# EAGLE board 2026-10-24_14-11-39 (EAGLE 6.4)
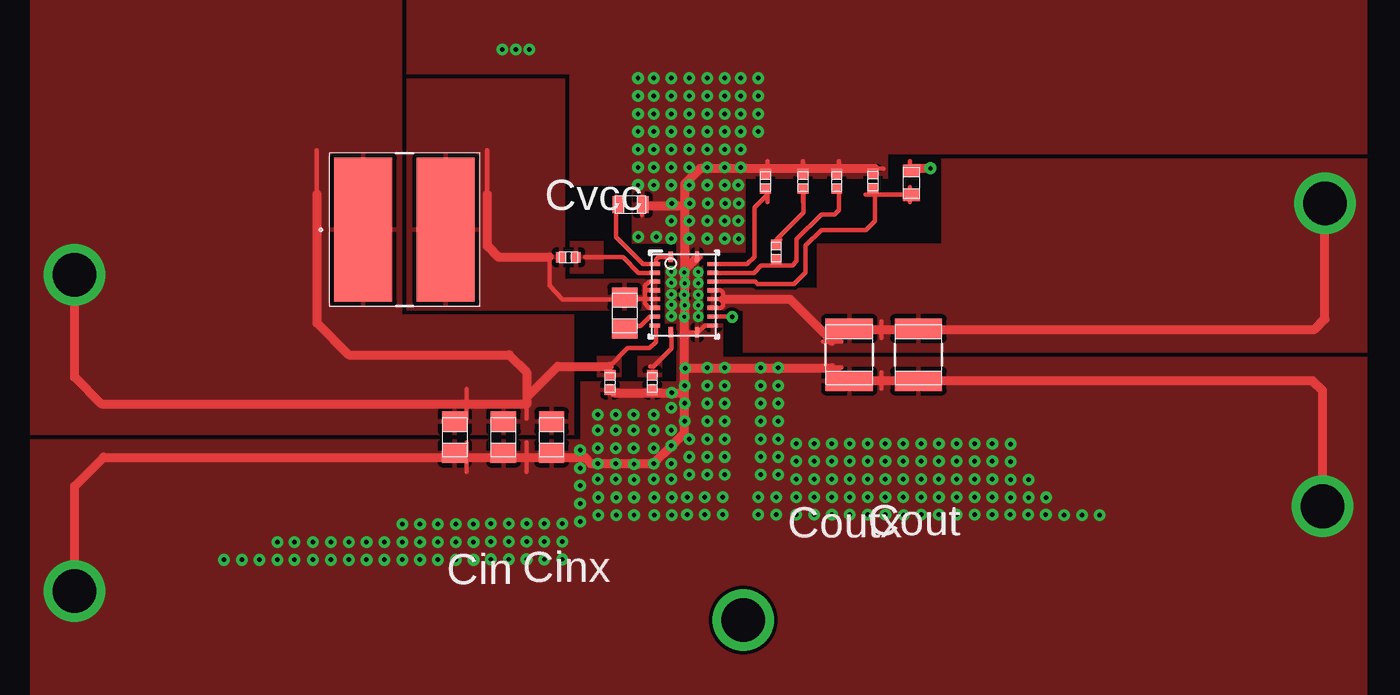
[diagram p0: board, top side]
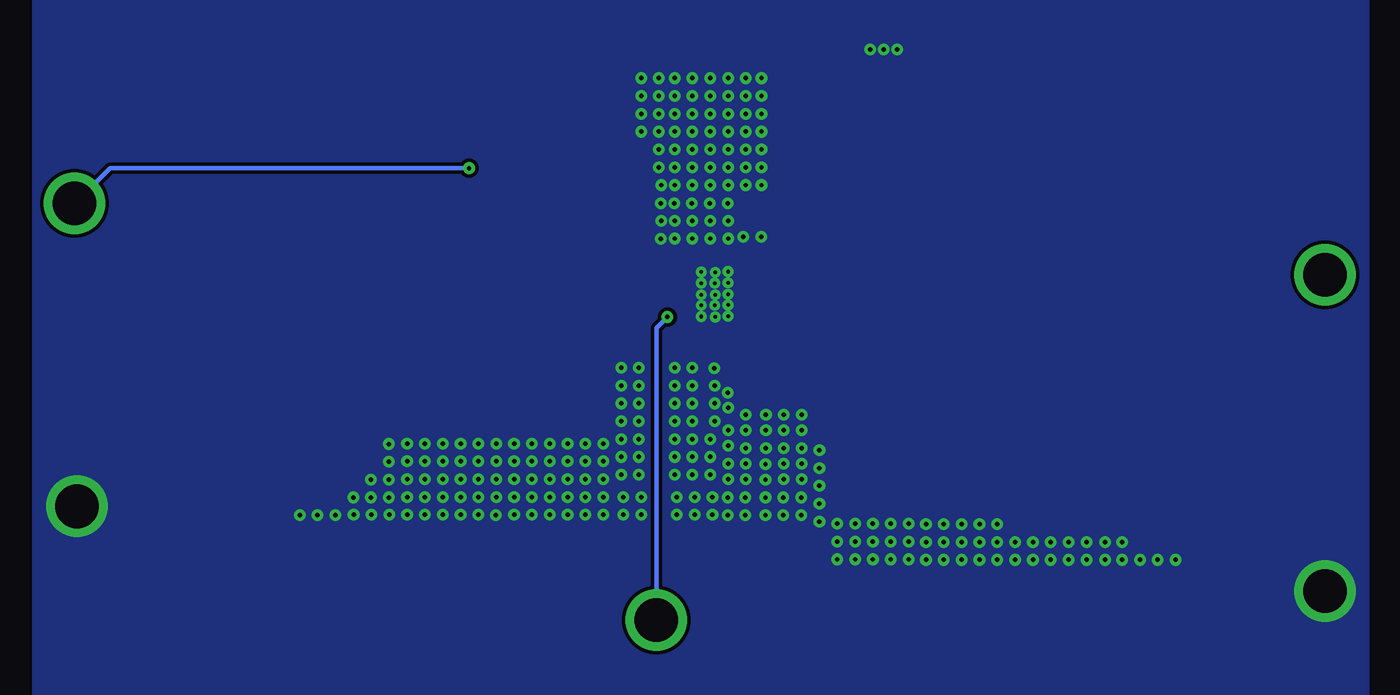
[diagram p1: board, bottom side, seen from below]

No outline drawn. Coordinates in mm, seen from the top.
Copper layers ((1*2)+(15*16)): TOP / INTERNAL1 / layer 15 / BOTTOM

## Footprints (pad centres in the part's own frame; a part is rotated, then mirrored left to right if it is on the bottom)
0805 = smd 1.118 x 1.448: 1 -0.902,0; 2 0.902,0
0402 = smd 0.559 x 0.61: 1 -0.419,0; 2 0.419,0
1210_280 = smd 1.118 x 2.692: 1 -1.499,0; 2 1.499,0
0603 = smd 0.66 x 0.965: 1 -0.699,0; 2 0.699,0
TP-1502 = drill 0.813 pad 1.651 round: 1 0,0
VLP8040 = smd 3.302 x 8.204: 1 -2.349,0; 2 2.349,0
RHL0020A = smd 0.24 x 0.6: 1 -0.75,2.15; 10 -0.75,-2.15; 11 0.75,-2.15; 20 0.75,2.15 | smd 0.6 x 0.24: 2 -1.65,1.75; 3 -1.65,1.25; 4 -1.65,0.75; 5 -1.65,0.25; 6 -1.65,-0.25; 7 -1.65,-0.75; 8 -1.65,-1.25; 9 -1.65,-1.75; 12 1.65,-1.75; 13 1.65,-1.25; 14 1.65,-0.75; 15 1.65,-0.25; 16 1.65,0.25; 17 1.65,0.75; 18 1.65,1.25; 19 1.65,1.75 | smd 0.3 x 0.3: 21 0,0

## Placement (x,y rotation side)
Cbst  [0805]  60.55,53.7 270 top
Ccomp  [0402]  70.71,61.19 90 top
Ccomp2  [0402]  72.64,61.19 90 top
Cin2  [0402]  59.72,49.73 270 top
Cin_1  [0805]  56.39,46.61 270 top
Cin_2  [0805]  53.64,46.61 270 top
Cin_3  [0805]  50.88,46.61 270 top
Cout_1  [1210_280]  73.36,51.31 270 top
Cout_2  [1210_280]  77.29,51.31 270 top
Css  [0402]  62.13,49.73 270 top
Cvcc_1  [0603]  60.88,59.87 0 top
Cvcc_2  [0603]  60.88,59.87 0 top
GND  [TP-1502]  29.18,37.85 270 top
GND1  [TP-1502]  100.28,42.65 270 top
L1  [VLP8040]  48.01,58.45 0 top
MODE  [TP-1502]  67.28,36.2 270 top
Rcomp  [0402]  69.19,57.18 90 top
Rfbb  [0402]  74.7,61.21 90 top
Rfbt  [0603]  76.89,61.11 270 top
Rlim  [0402]  68.58,61.19 90 top
Rt  [0402]  57.35,56.87 0 top
U1  [RHL0020A]  63.93,54.74 0 top
VIN  [TP-1502]  29.18,55.83 270 top
VOUT  [TP-1502]  100.38,59.89 270 top

## Library data of the parts
Cbst = ultra-librarian; RefDes: Cbst; Type: 08053C104KAT2A
Ccomp = ultra-librarian; RefDes: Ccomp; Type: GRM1555C1E751JA01D
Ccomp2 = ultra-librarian; RefDes: Ccomp2; Type: GRM1555C1E390JA01D
Cin2 = ultra-librarian; RefDes: Cin2; Type: GRM155R71A104KA01D
Cin_1-Cin_3 Cout_1 Cout_2 Cvcc_1 Cvcc_2 = ultra-librarian
Css = ultra-librarian; RefDes: Css; Type: GRM155R71C822KA01D
GND = ultra-librarian; RefDes: GND; Type: TP-1502
GND1 = ultra-librarian; RefDes: GND1; Type: TP-1502
L1 = ultra-librarian; RefDes: L1; Type: VLP8040T-1R0N
MODE = ultra-librarian; RefDes: MODE; Type: TP-1502
Rcomp = ultra-librarian; RefDes: Rcomp; Type: CRCW040226K7FKED
Rfbb = ultra-librarian; RefDes: Rfbb; Type: CRCW040269K8FKED
Rfbt = ultra-librarian; RefDes: Rfbt; Type: RC0603FR-07220KL
Rlim = ultra-librarian; RefDes: Rlim; Type: CRCW0402154KFKED
Rt = ultra-librarian; RefDes: Rt; Type: CRCW0402267KFKED
U1 = ultra-librarian; RefDes: U1; Type: TPS61088RHLR
VIN = ultra-librarian; RefDes: VIN; Type: TP-1502
VOUT = ultra-librarian; RefDes: VOUT; Type: TP-1502

## Nets
0: Ccomp2.2 Ccomp.2 Cin2.2 Cin_1.2 Cin_2.2 Cin_3.2 Cout_1.2 Cout_2.2 Css.2 Cvcc_1.2 Cvcc_2.2 GND1.1 GND.1 Rfbb.2 Rlim.2 U1.11 U1.12 U1.20 U1.21
2: Cin2.1 Cin_1.1 Cin_2.1 Cin_3.1 L1.1 U1.9 VIN.1
3: Ccomp.1 Rcomp.2
4: Cvcc_1.1 Cvcc_2.1 U1.1 U1.2
5: Ccomp2.1 Rcomp.1 U1.18
9: Cout_1.1 Cout_2.1 Rfbt.1 U1.14 U1.15 U1.16 VOUT.1
11: Rfbb.1 Rfbt.2 U1.17
12: Cbst.1 L1.2 Rt.1 U1.4 U1.5 U1.6 U1.7
14: Rlim.1 U1.19
17: Css.1 U1.10
18: Cbst.2 U1.8
19: Rt.2 U1.3
25: MODE.1 U1.13

## Tracks (layer width: path | path; a pad name or v marks a point on that pad's centre or on a via)
0  (via drill 0.2 pad 0.48, 0.25 pad 0.51, 2.49 pad 3.48)
  TOP 0.254: 65.61,52.98 65.13,52.98 64.72,52.58 63.98,52.58 63.96,52.58 | 74.27,61.94 75.31,61.94 | 72.76,61.52 72.76,62.36 | 70.73,61.52 70.73,62.36 | 68.69,61.52 68.69,62.36 | 71.86,50.58 72.9,50.58 | 61.56,59.28 61.56,60.33 | 54.97,44.63 54.97,46.3 | 75.18,49.38 75.18,50.32 | 51.54,44.63 51.54,46.3
  TOP 0.508: 63.98,59.82 63.98,60.98 63.98,61.06 64.87,61.95 68.71,61.95 70.74,61.95 | 63.98,59.82 63.98,58.95 63.98,56.16 | 63.98,56.16 v63.98,55.4 v63.98,54.13 63.98,53.49 v63.96,53.47 63.96,52.58 63.96,50.67 | 61.57,59.82 63.98,59.82 | 63.96,49.4 63.96,50.67 | 63.96,49.4 63.96,46.86 v63.22,46.13 v62.2,45.11 v60.05,45.11 v59.03,45.11 58.62,45.11 58.29,45.47 54.99,45.47 51.56,45.47 30.86,45.47 29.21,43.81 v29.21,37.85 | 59.69,49.4 59.94,49.15 62,49.15 63.73,49.15 63.96,49.4 | 63.96,50.67 64.03,50.57 v69.32,50.57 72.36,50.57 73.13,49.84 75.18,49.84 99.75,49.84 100.33,49.28 v100.33,42.67 | 63.98,56.16 64.72,56.9 | 59.69,49.4 | 63.96,49.4 | 70.74,61.95 72.77,61.95 74.8,61.95 | 70.74,61.95 | 74.8,61.95 | 61.57,59.82
  other vias: 63.22,54.76 63.96,56.01 64.74,54.74 63.22,53.52 63.22,54.15 63.22,56.06 37.72,39.62 39.75,39.62 41.73,39.62 67.06,59.94 87.63,42.16 86.61,42.16 85.6,42.16 84.58,43.18 83.57,43.18 82.55,45.21 82.55,44.2 82.55,43.18 82.55,46.23 40.77,39.62 40.77,40.64 41.73,40.64 42.8,39.62 42.8,40.64 43.81,39.62 43.81,40.64 44.83,39.62 44.83,40.64 45.85,39.62 45.85,40.64 55.12,68.71 76.45,42.16 64.01,50.55 69.19,43.21 58.01,44.86 63.22,48.29 73.38,46.25 63.96,54.74 48.9,40.64 48.9,39.62 48.9,41.66 60.07,42.16 60.07,43.18 47.88,41.66 47.88,39.62 47.88,40.64 46.86,40.64 46.86,39.62 61.09,43.18 61.09,42.16 49.91,41.66 49.91,39.62 49.91,40.64 50.93,40.64 50.93,39.62 50.93,41.66 62.23,42.16 62.23,43.18 64.74,54.13 64.74,53.49 64.74,55.4 63.22,55.42 64.74,56.03 68.3,50.57 66.27,50.57 65.25,50.57 68.3,49.56 65.25,49.56 66.27,49.56 66.27,47.52 63.22,47.02 63.98,47.52 65.25,47.52 60.05,47.9 59.03,47.9 68.17,43.21 66.14,43.21 58.01,45.87 64.11,43.21 63.25,43.18 65.13,43.21 69.32,49.56 64.11,42.19 63.25,42.16 69.19,42.19 65.13,42.19 66.14,42.19 68.17,42.19 61.06,47.02 59.03,47.02 60.05,47.02 62.2,47.02 79.48,45.24 74.4,45.24 72.36,45.24 73.38,45.24 78.46,45.24 75.41,45.24 76.43,45.24 77.44,45.24 70.33,45.24 69.32,47.52 68.3,47.52 71.35,45.24 71.35,44.22 68.3,46.51 69.32,46.51 70.33,44.22 77.44,44.22 76.43,44.22 75.41,44.22 78.46,44.22 73.38,44.22 72.36,44.22 74.4,44.22 79.48,44.22 60.05,46 59.03,46 58.01,43.84 61.06,46 55.98,41.68 54.97,41.68 53.95,41.68 57,41.68 51.94,41.66 52.93,41.68 65.25,46.51 64.24,46.51 66.27,46.51 66.27,44.48 63.22,44.22 64.24,44.48 65.25,44.48 52.93,39.65 51.94,39.62 57,39.65 53.95,39.65 54.97,39.65 55.98,39.65 61.09,44.2 58.01,41.81 59.03,44.22 60.05,44.22 62.2,44.22 79.48,42.19 74.4,42.19 72.36,42.19 73.38,42.19 78.46,42.19 75.41,42.19 77.44,42.19 70.33,42.19 69.32,44.48 68.3,44.48 71.35,42.19 71.35,43.21 68.3,45.49 69.32,45.49 70.33,43.21 77.44,43.21 76.43,43.21 75.41,43.21 78.46,43.21 73.38,43.21 72.36,43.21 74.4,43.21 79.48,43.21 58.01,42.82 55.98,40.67 54.97,40.67 53.95,40.67 57,40.67 51.94,40.64 52.93,40.67 65.25,45.49 64.24,45.49 63.22,45.11 66.27,45.49 83.54,42.19 80.49,42.19 81.51,42.19 82.52,42.19 84.56,42.19 65.25,57.94 63.22,57.94 64.24,57.94 66.27,57.94 65.25,58.95 63.22,58.95 64.24,58.95 66.27,58.95 66.29,59.94 63.25,59.94 64.26,59.94 65.28,59.94 66.27,60.99 63.22,60.99 64.24,60.99 65.25,60.99 67.03,60.99 61.32,62 67.16,62 65.25,62 64.24,62 63.22,62 66.27,62 62.2,63.02 66.27,63.02 63.22,63.02 64.24,63.02 65.25,63.02 67.16,63.02 68.17,64.03 67.16,64.03 65.25,64.03 64.24,64.03 63.22,64.03 66.27,64.03 62.2,64.03 62.2,65.05 66.27,65.05 63.22,65.05 64.24,65.05 65.25,65.05 67.16,65.05 68.17,65.05 68.17,66.07 67.16,66.07 65.25,66.07 64.24,66.07 63.22,66.07 66.27,66.07 62.2,66.07 68.17,67.08 67.16,67.08 65.25,67.08 64.24,67.08 63.22,67.08 66.27,67.08 62.2,67.08 61.32,60.99 62.2,62 62.2,60.99 71.35,46.25 68.3,48.54 69.32,48.54 70.33,46.25 77.44,46.25 76.43,46.25 75.41,46.25 78.46,46.25 72.36,46.25 74.4,46.25 79.48,46.25 62.2,47.9 61.06,47.9 65.25,48.54 66.27,48.54 81.51,46.25 80.49,46.25 81.51,43.21 80.49,43.21 81.51,44.22 80.49,44.22 80.49,45.24 81.51,45.24 61.32,67.08 61.32,66.07 61.32,65.05 61.32,64.03 61.32,63.02 63.25,49.15 59.05,42.16 59.05,43.18 53.59,68.71 38.73,39.62 54.36,68.71 63.98,49.56 63.98,48.54 62.2,46 61.09,45.09 83.57,44.2 62.36,58.04 61.34,58.04 67.06,57.91 67.03,58.95
  pour TOP: 58.04,49.78 63.5,49.78 63.5,53.09 62.87,53.09 62.87,56.39 63.5,56.39 63.5,57.66 60.96,57.66 60.96,60.96 57.4,60.96 57.4,67.31 48.13,67.31 48.13,82.55 102.87,82.55 102.87,62.74 75.56,62.74 75.56,61.34 67.44,61.34 67.44,57.15 65.02,57.15 65.02,53.09 66.17,53.09 66.17,51.18 102.87,51.18 102.87,26.67 26.67,26.67 26.67,46.48 58.04,46.48
  pour BOTTOM: 26.67,26.67 26.67,82.55 102.87,82.55 102.87,26.67
2  (via drill 2.49 pad 3.48)
  TOP 0.254: 59.69,50.65 60.71,51.69 61.98,51.69 62.33,52.05 62.33,52.98 | 54.97,47.68 54.97,49.35 | 43,57.94 43,62.97 | 51.54,47.68 51.54,49.35
  TOP 0.508: 54.99,48.9 54.99,50.29 53.98,51.31 44.83,51.31 43.03,53.11 43.03,60.45 | 54.99,48.9 54.99,48.51 51.56,48.51 30.73,48.51 29.21,50.04 v29.21,55.88 | 59.69,50.65 56.74,50.65 54.99,48.9
  pour TOP: 58.98,50.04 58.98,51.23 60.38,51.23 60.38,50.04
  pour TOP (rank 4): 47.88,82.55 47.88,53.59 57.66,53.59 57.66,46.74 26.67,46.74 26.67,82.55
3
  TOP 0.254: 69.44,57.89 69.22,57.89 70.74,59.41 70.74,60.45 | 70.73,60.02 70.73,60.86
4
  TOP 0.254: 63.22,56.9 62.48,56.9 62.33,56.74 62.33,56.49 61.59,56.49 60.07,58.01 60.07,59.82 | 60.06,59.28 60.06,60.33
5
  TOP 0.254: 65.61,55.98 67.92,55.98 68.33,56.39 69.22,56.39 70.1,56.39 70.36,56.64 70.36,57.91 71.75,59.31 72.52,59.31 72.77,59.56 72.77,60.45 | 72.76,60.02 72.76,60.86
9  (via drill 0.25 pad 0.51, 2.49 pad 3.48)
  TOP 0.254: 65.61,54.99 66.02,54.99 66.17,54.86 66.17,54.48 | 65.61,53.98 66.04,53.98 66.17,54.1 66.17,54.48 | 65.61,54.48 66.17,54.48 | 76.82,61.52 76.82,62.36 | 71.86,52.08 72.9,52.08 | 75.18,52.27 75.18,53.21
  TOP 0.508: v100.46,59.94 100.46,53.34 99.87,52.76 75.18,52.76 73.05,52.76 72.36,52.09 69.98,54.48 66.17,54.48 | 76.83,61.95 v77.98,61.95
  BOTTOM 0.254: v100.46,59.94 98.42,61.95 v77.98,61.95
  pour TOP (rank 6): 65.28,53.85 65.28,55.12 71.5,55.12 71.5,57.66 78.61,57.66 78.61,62.48 102.87,62.48 102.87,51.44 67.31,51.44 67.31,53.85
11
  TOP 0.254: 65.61,55.5 68,55.5 68.12,55.35 70.21,55.35 70.87,56.01 70.87,57.53 71.75,58.42 74.3,58.42 74.8,58.93 74.8,60.45 | 74.8,60.45 76.83,60.45 | 74.8,60.45 | 76.82,60.02 76.82,60.86 | 74.27,60.44 75.31,60.44
12
  TOP 0.254: 62.33,55.5 61.98,55.5 61.72,55.24 61.72,54.99 | 62.33,53.98 61.95,53.98 61.72,54.23 61.72,54.48 | 61.72,54.48 62.33,54.48 | 61.72,54.99 62.33,54.99 | 61.72,54.99 | 61.72,54.48 60.6,54.48 60.58,54.46 57.02,54.46 56.26,55.24 56.26,56.9 | 61.72,54.48 61.72,54.99 | 52.7,57.94 52.7,62.97
  TOP 0.508: 52.73,60.45 52.73,57.51 53.34,56.9 56.26,56.9
  pour TOP (rank 5): 48.13,53.85 48.13,67.06 57.15,67.06 57.15,55.63 62.61,55.63 62.61,53.85
14
  TOP 0.254: 65.61,56.49 67.54,56.49 67.94,56.9 67.94,59.69 68.71,60.45 | 68.69,60.02 68.69,60.86
17
  TOP 0.254: 63.22,52.58 63.22,51.66 62.2,50.65 62,50.65
  pour TOP (rank 2): 61.29,50.04 61.29,51.23 62.69,51.23 62.69,50.04
18
  TOP 0.254: 60.58,52.96 61.47,52.96 62,53.49 62.33,53.49
19
  TOP 0.254: 62.33,55.98 61.34,55.98 60.45,56.9 58.29,56.9
  pour TOP (rank 3): 57.45,55.96 57.45,57.78 59.36,57.78 59.36,55.96
25  (via drill 0.25 pad 0.51, 2.49 pad 3.48)
  TOP 0.254: v66.67,53.47 66.62,53.49 65.61,53.49
  BOTTOM 0.254: v67.31,36.2 67.31,52.83 v66.67,53.47

## Text on the board
ASSYNOTES: Design Rules: Min Clearance: 10mil | Min Track Width: 10mil | Cvcc | Coutx | Cout | Cin | Cinx